# Altium PCB MB1364.PcbDoc (part 3 of 9)
Units mm, origin at the board's own origin, x right, y up, seen from the top; angles counter-clockwise.
Board outline 70 x 133.34 mm, 6 copper layers (Top Layer, Signal Layer 1, Signal Layer 2, Signal Layer 3, Signal Layer 4, Bottom Layer), stack 1.57 mm thick; 321 components, 287 nets, 1372 pads, 2051 vias.
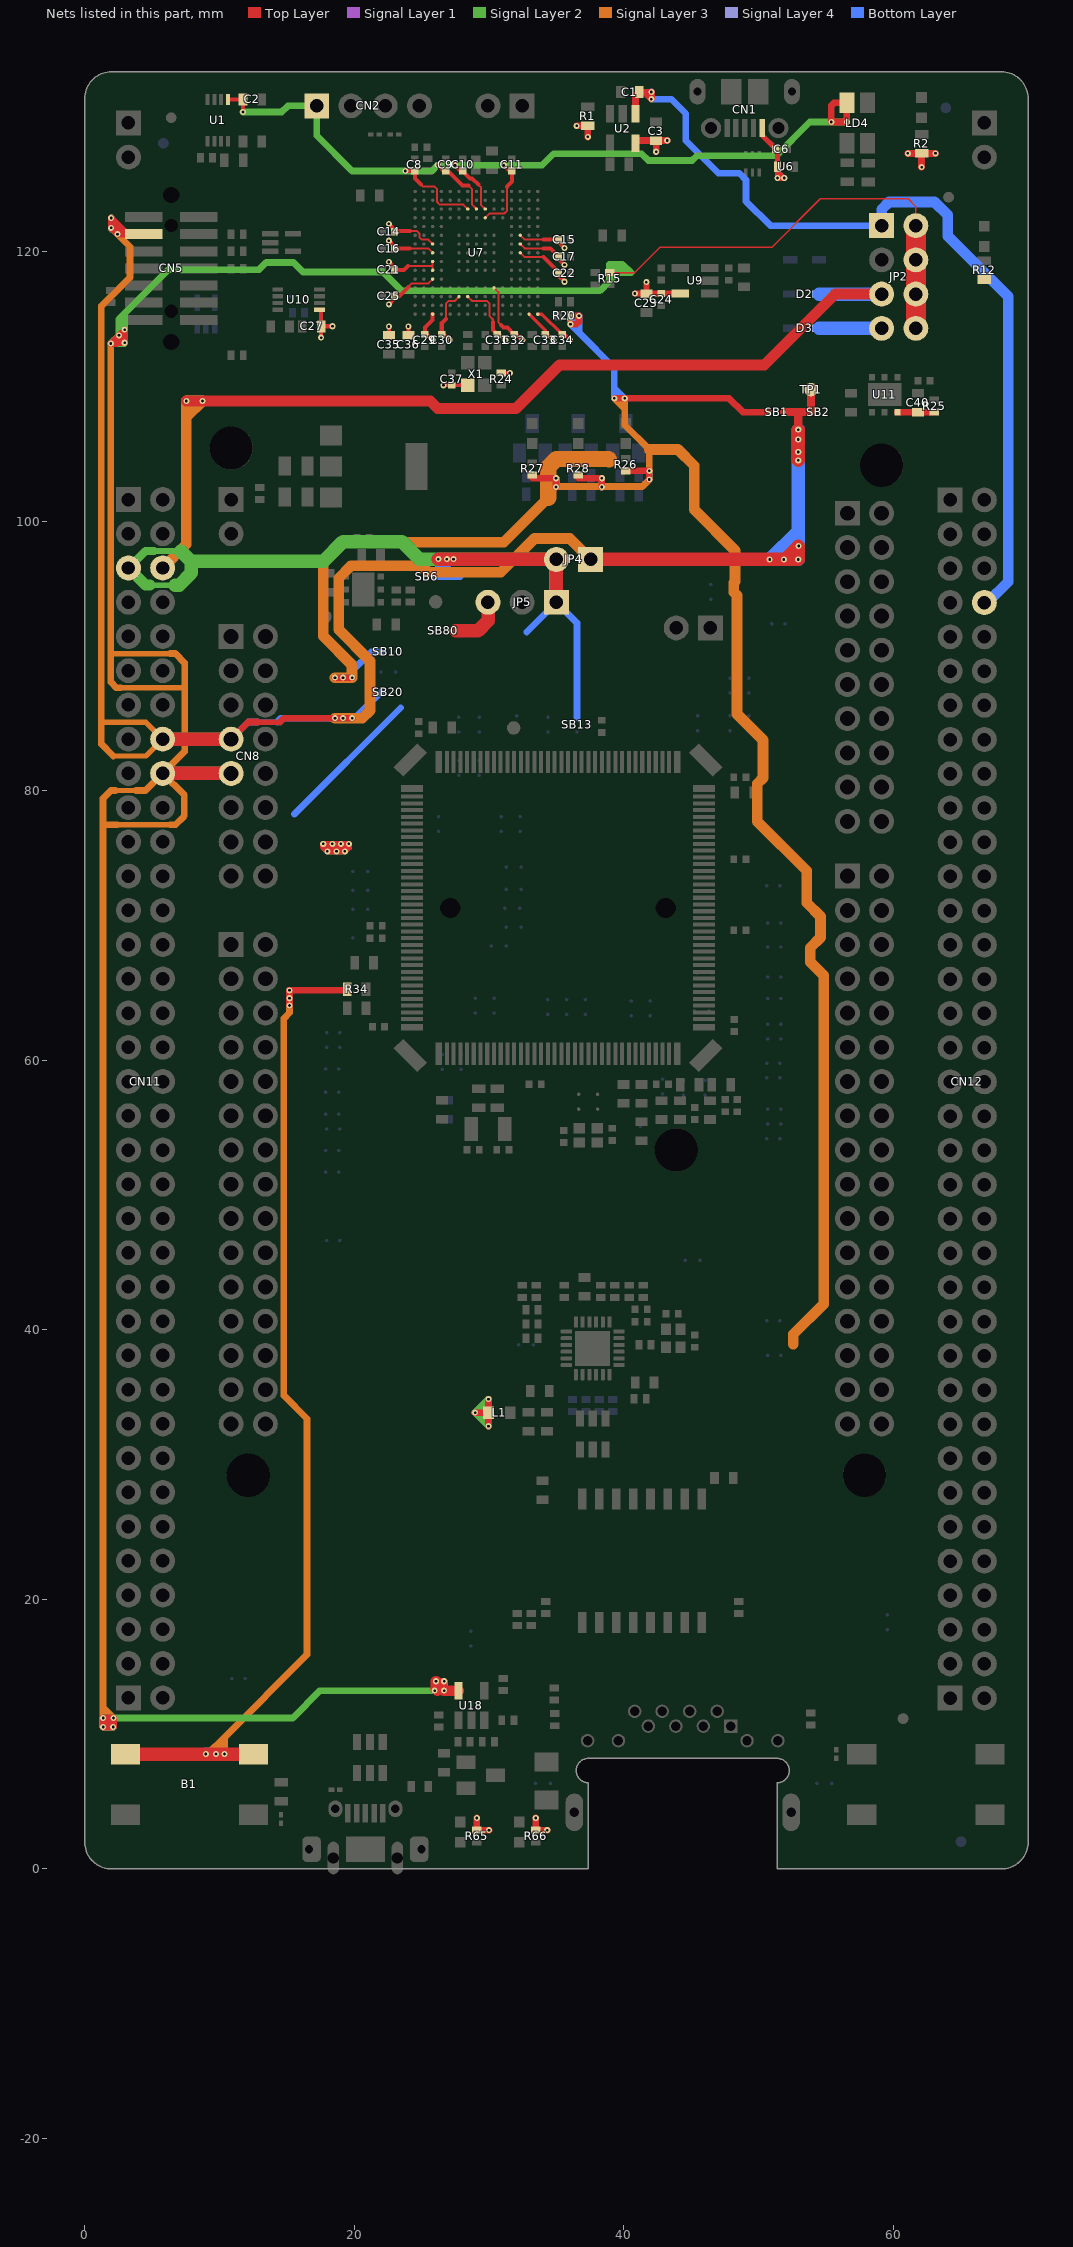
[diagram p6: the nets of this part, all layers, seen from the top]

## Part data (continued)
U19: library part MCD-00163, "Very low capacitance ESD protection", Manufacturer=STMICROELECTRONICS, ComponentLink1Description=Datasheet, ComponentLink1URL=http://tunmcdsvn.tun.st.com/Component_Datasheet_Library/Trunk/Diodes/STM_ESD_USBLC6-2, Initial_Board_Reference=MB1263, Internal_Part_Number=MCD-00163, Manufacturer_Part_Number=USBLC6-2SC6, Part_Type=IC, Provided_By=Subcon, Status=Released
X1: library part MCD-00597, "Oscillator 25.00Mhz, -+50PPM, 3.3V, Temp -55 to +125°C", Alternate_Manufacturer="AVX CORP/KYOCERA CORP", Alternate_Manufacturer_Part_Number=KC2520B25.0000C10E00, Manufacturer=NDK, Manufacturer_Part_Number="NZ2520SB 25MHz END4869B", ComponentLink1Description=Datasheet, ComponentLink1URL=http://tunmcdsvn.tun.st.com/Component_Datasheet_Library/Trunk/Crystal_Osc/NDK_OSCILLATOR_NZ2520SB, Initial_Board_Reference=MB1331, Internal_Part_Number=MCD-00597, Order_Code_Digikey=478-4780-1-ND, Part_Type=Crystal_Osc, Provided_By=STM, Status=Checked
X2: library part MCD-00091, "Crystal 32.768kHz, 6pF, -+20PPM, R=50K, SMD", Manufacturer=NDK, Manufacturer_Part_Number="NX3215SA 32.768KHz EXS00A-MU00525", ComponentLink1Description=Datasheet, ComponentLink1URL="http://tunmcdsvn.tun.st.com/Component_Datasheet_Library/Trunk/Crystal_Osc/NDK_Crystal-For-ST_NX3215SA 32.768KHz EXS00A-MU00525 (EXS10B-21238)", Initial_Board_Reference=MB1274, Internal_Part_Number=MCD-00091, Part_Type=Crystal_Osc, Provided_By=STM, Status=Released
X3 X4: library part MCD-01364, "25MHz Crystal. 2x1.6mm package size. 20ppm. Load capacitance: 6pF. Spec EXS00A-CS11321", Manufacturer=NDK, Manufacturer_Part_Number="NX2016SA 25MHz EXS00A-CS11321", Package=NX2016SA, ComponentLink1Description=Datasheet, ComponentLink1URL="http://tunmcdsvn.tun.st.com/Component_Datasheet_Library/Trunk/Crystal_Osc/NDK_NX2016SA 25MHz EXS00A-CS11321 (EXS10B-28187)", Initial_Board_Reference=MB1363, Internal_Part_Number=MCD-01364, Part_Type=Crystal_Osc, Provided_By=Subcon, Status=Checked

## Free pads (board coordinates)
  round 3.2 hole 3.2 unplated: 0(10.866,105.409) 0(12.136,29.209) 0(43.886,53.339) 0(57.856,29.209) 0(59.126,104.139)

## Via types
v1: diameter 0.45, hole 0.2, Top Layer to Bottom Layer, tented both sides, 1975 vias
v2: diameter 0.45, hole 0.2, Top Layer to Bottom Layer, tented top, 67 vias
v3: diameter 0.6, hole 0.3, Top Layer to Bottom Layer, tented both sides, 9 vias

## Nets (pads, with @x,y where several pads share a name; then routed paths per layer and width w, separated by ;. In a path a pad name is that pad's centre, name@x,y a point inside that pad or via, vN(x,y) a via of type N, cw(c..) or ccw(c..) an arc to the next point about the centre after c; other vN are vias at no path point)
1V8_VDD: JP5.3 SB80.2 | length 4.3
  Top Layer w0.6: 27.3,91.85 27.525,91.85
  Top Layer w1: 27.525,91.85 29.175,91.85 29.925,92.6 JP5.3@29.925,93.975
3V3: CN5.3 CN8.7 CN11.16 JP4.1 SB1.1 SB2.2 SB20.1 TP1.1 | length 184.6
  Top Layer w0.4: 12.845,85.089 14.501,85.089
  Top Layer w0.5: CN5.3@4.389,121.284 CN5.3@3.161,121.284 ; CN8.7@10.866,83.819 12.136,85.089 12.845,85.089 ; 14.501,85.089 14.791,85.379 v1(18.566,85.379) v1(19.166,85.379) v1(19.841,85.379) ; v1(2.436,121.284) 2.436,122.009 ; v1(2.436,121.284) v1(1.966,121.754) v1(1.966,122.479) 2.436,122.009 ; v1(2.436,121.284) CN5.3@3.161,121.284 ; 2.436,122.009 CN5.3@3.161,121.284
  Top Layer w0.6: SB1.1@51.891,108.079 52.941,108.079 ; v1(52.941,106.779) 52.941,108.079 ; TP1.1@53.891,109.754 SB2.2@53.891,108.079 52.941,108.079
  Top Layer w1: CN11.16@5.786,83.819 CN8.7@10.866,83.819 ; JP4.1@37.536,97.154 v1(50.816,97.154) v1(51.866,97.154) v1@51.966,97.154 ; v1(52.941,104.504) v1(52.941,105.129) v1(52.941,106.054) v1(52.941,106.779) ; v1@51.966,97.154 52.941,98.129 v1(52.941,97.154) v1@51.966,97.154
  Signal Layer 2 w0.5: v1(1.966,122.479) v1(1.966,121.754) v1(2.436,121.284) ; v1(18.566,85.379) v1(19.166,85.379) v1(19.841,85.379)
  Signal Layer 2 w0.6: v1(50.816,97.154) v1(51.866,97.154) v1@51.966,97.154 ; v1(52.941,104.504) v1(52.941,105.129) v1(52.941,106.054) v1(52.941,106.779) ; v1@51.966,97.154 v1(52.966,98.154) 52.966,97.179 v1(52.941,97.154) v1@51.966,97.154
  Signal Layer 2 w1: CN11.16@5.786,83.819 CN8.7@10.866,83.819
  Signal Layer 3 w0.4: 1.316,85.079 4.526,85.079 CN11.16@5.786,83.819 4.541,82.574 2.121,82.574
  Signal Layer 3 w0.5: 1.316,85.079 1.236,85.159 ; 2.121,82.574 1.236,83.459 1.236,85.159 ; v1(19.166,85.379) v1(19.841,85.379) ; 1.236,85.159 1.236,115.949 3.366,118.079 3.366,120.354 v1(2.436,121.284) ; v1(2.436,121.284) 2.436,122.009 v1(1.966,122.479) v1(1.966,121.754) v1(2.436,121.284)
  Signal Layer 3 w0.6: v1@50.941,97.154 v1(51.866,97.154) v1@51.966,97.154 ; v1(52.941,104.504) v1(52.941,105.129) v1(52.941,106.054) v1(52.941,106.779) ; v1@51.966,97.154 v1(52.966,98.154) 52.966,97.179 v1(52.941,97.154) v1@51.966,97.154
  Signal Layer 3 w0.8: v1(18.566,85.379) v1(19.166,85.379) v1(19.841,85.379) 20.591,85.379 21.166,85.954 21.166,89.629 18.841,91.954 18.841,95.757 19.762,96.679 25.041,96.679 25.516,96.204 30.866,96.204 33.366,98.704 35.986,98.704 JP4.1@37.536,97.154
  Bottom Layer w0.4: 12.845,85.089 14.281,85.089
  Bottom Layer w0.5: v1(1.966,122.479) v1(1.966,121.754) v1(2.436,121.284) ; CN8.7@10.866,83.819 12.136,85.089 12.845,85.089 ; 14.281,85.089 14.571,85.379 17.216,85.379 ; 17.231,85.364 17.216,85.379 ; SB20.1@21.975,87.3 20.054,85.379 v1(19.841,85.379) v1(19.166,85.379) v1(18.566,85.379) 17.234,85.379 17.216,85.379
  Bottom Layer w1: v1(50.816,97.154) v1@50.841,97.154 ; v1(52.941,106.779) v1(52.941,106.054) v1(52.941,105.129) v1(52.941,104.504) 52.941,99.254 ; v1@50.841,97.154 52.941,99.254 ; v1@50.841,97.154 v1(51.866,97.154) ; v1(51.866,97.154) v1@52.941,98.229 ; v1(51.866,97.154) v1(52.941,97.154) v1@52.941,98.229 ; v1@52.941,98.229 52.941,99.254
3V3_PER: L1.2 R20.2 R26.2 R27.2 R28.2 R65.2 R66.2 SB1.2 SB10.1 | length 183.7
  Top Layer w0.5: v1(18.566,88.379) v1(19.166,88.379) v1(19.841,88.379) ; v1(28.966,33.854) L1.2@29.966,33.854 ; v1(29.091,3.779) R65.2@29.091,2.879 v1(29.991,2.879) ; v1(29.966,32.854) L1.2@29.966,33.854 ; v1(29.966,34.854) L1.2@29.966,33.854 ; R27.2@33.216,103.179 v1(34.966,103.179) v1(34.966,102.529) ; v1(33.466,3.779) R66.2@33.466,2.879 v1(34.316,2.879) ; R28.2@36.616,103.179 v1(38.366,103.179) v1(38.366,102.529) ; v1(39.291,109.104) v1(40.066,109.104) 47.816,109.104 48.841,108.079 SB1.2@50.791,108.079 ; R26.2@40.141,103.729 v1(41.891,103.729) v1(41.891,103.079) ; v1(36.041,114.604) R20.2@36.041,115.229 v1(36.666,115.229) 36.666,114.779 36.491,114.604 v1(36.041,114.604)
  Signal Layer 2 w0.5: v1(18.566,88.379) v1(19.166,88.379) v1(19.841,88.379) ; v1(29.966,32.854) v1(28.966,33.854) v1(29.966,34.854)
  Signal Layer 3 w0.5: v1(34.966,103.179) v1(34.966,102.529) 35.011,102.574 38.321,102.574 v1(38.366,102.529) ; v1(38.366,103.179) v1(38.366,102.529) ; v1(38.366,102.529) 38.399,102.562 41.374,102.562 v1(41.891,103.079) v1(41.891,103.729) 41.891,105.304 40.066,107.129 40.066,108.329 ; 40.066,108.329 v1(39.291,109.104) v1(40.066,109.104) 40.066,108.329
  Signal Layer 3 w0.8: v1(18.566,88.379) v1(19.166,88.379) v1(19.841,88.379) 19.841,89.329 17.691,91.479 17.691,96.854 19.266,98.429 31.091,98.429 34.391,101.729 ; 41.891,105.304 44.016,105.304 45.216,104.104 45.216,100.854 48.25,97.82 48.25,95.524 48.155,95.429 48.155,94.716 48.395,94.476 48.395,85.68 50.32,83.755 50.32,80.934 49.905,80.519 49.905,77.72 ; 49.905,78.75 49.905,77.72 ; 52.575,38.95 52.575,39.675 54.825,41.925 54.825,66.291 53.833,67.283 53.833,68.337 54.595,69.099 54.595,70.658 53.575,71.678 53.575,74.05 49.905,77.72
  Signal Layer 3 w1.2: 34.391,101.729 34.391,104.004 34.991,104.604 38.866,104.604 38.891,104.579
  Bottom Layer w0.5: v1(18.566,88.379) v1(19.166,88.379) v1(19.841,88.379) 19.841,88.866 21.275,90.3 SB10.1@21.975,90.3 ; v1(29.966,32.854) v1(28.966,33.854) v1(29.966,34.854) ; v1(34.966,102.529) v1(34.966,103.179) ; v1(38.366,102.529) v1(38.366,103.179) ; v1(41.891,103.079) v1(41.891,103.729) ; v1(36.041,114.604) v1(36.666,115.229) 36.666,114.579 ; v1(36.041,114.604) 36.666,113.979 ; v1(36.041,114.604) 36.641,114.604 36.666,114.579 ; 36.666,113.979 36.666,114.579 ; 36.666,113.979 39.291,111.354 39.291,109.879 ; 39.291,109.879 v1(40.066,109.104) v1(39.291,109.104) 39.291,109.879
3V3_STLK: C2.2 C8.2 C9.2 C10.2 C11.2 C14.2 C15.2 C16.2 C17.2 C21.2 C22.2 C23.2 C24.2 C25.2 C27.2 C29.2 C30.2 C31.2 C32.2 C33.2 C34.2 C35.2 C36.2 C37.2 CN2.1 LD4.4 R24.1 U1.1 U7.C1 U7.C5 U7.C6 U7.C7 U7.C8 U7.C9 U7.F3 U7.G3 U7.G13 U7.H13 U7.J12 U7.J13 U7.K4 U7.N8 U7.N9 U7.N10 U7.P1 U7.R1 U9.5 U10.1 X1.4 | length 141.5
  Top Layer w0.15: 23.996,118.924 25.224,118.924 ; 24.016,117.379 24.271,117.634 25.496,117.634 U7.C5@25.816,117.954 ; 24.116,120.229 25.491,120.229 U7.C8@25.816,119.904 ; 24.141,121.529 24.644,121.529 24.836,121.336 24.836,121.059 25.016,120.879 25.491,120.879 U7.C9@25.816,120.554 ; 24.966,124.954 25.091,124.829 25.941,124.829 26.146,124.624 26.146,123.671 26.339,123.479 28.091,123.479 U7.G13@28.416,123.154 ; 25.225,118.925 25.224,118.924 ; 25.8,118.95 25.774,118.924 25.224,118.924 ; U7.C6@25.816,118.604 U7.C7@25.816,119.254 ; 26.791,114.979 26.791,116.131 26.984,116.324 27.436,116.324 U7.F3@27.766,116.654 ; U7.G3@28.416,116.654 28.736,116.334 29.839,116.334 30.036,116.136 30.036,115.209 30.291,114.954 30.291,114.779 ; 28.466,124.904 28.746,124.624 28.746,123.474 U7.H13@29.066,123.154 ; 29.216,124.954 29.396,124.774 29.396,123.474 U7.J13@29.716,123.154 ; U7.J12@29.716,122.504 30.041,122.829 31.144,122.829 31.336,123.021 31.336,124.799 31.341,124.804 ; U7.K4@30.366,117.304 30.686,116.984 30.686,114.759 30.891,114.554 ; U7.N8@32.316,119.904 32.641,119.579 34.041,119.579 ; U7.N9@32.316,120.554 32.641,120.229 34.041,120.229 ; U7.N10@32.316,121.204 32.641,120.879 34.041,120.879
  Top Layer w0.25: U7.P1@32.966,115.354 34.166,114.154 C33.2@34.166,113.854 ; U7.R1@33.616,115.354 33.916,115.354 C34.2@35.416,113.854
  Top Layer w0.3: U1.1@10.616,131.279 C2.2@11.741,131.279 v1(11.741,130.354) ; U10.1@17.416,115.679 17.541,115.554 C27.2@17.541,114.454 ; v1(17.541,113.604) C27.2@17.541,114.454 ; v1(18.391,114.454) C27.2@17.541,114.454 ; v1(22.562,116.083) 22.991,116.512 C25.2@22.991,116.679 23.316,116.679 24.016,117.379 ; v1(22.562,119.225) 22.991,118.796 C21.2@22.991,118.629 23.701,118.629 23.996,118.924 ; v1(22.562,120.8) 22.991,120.371 C16.2@22.991,120.204 23.016,120.229 24.116,120.229 ; v1(22.562,122.05) 22.991,121.621 C14.2@22.991,121.454 23.066,121.529 24.141,121.529 ; C35.2@22.566,113.779 v1(22.566,114.429) ; v1(23.791,125.979) C8.2@24.491,125.979 24.491,125.429 24.966,124.954 ; C36.2@24.016,113.779 v1(24.016,114.429) ; U7.C1@25.816,115.354 25.816,114.929 25.241,114.354 C29.2@25.241,113.854 25.408,113.854 v1(25.837,113.425) ; v1(26.195,126.408) 26.624,125.979 C9.2@26.791,125.979 26.966,125.979 28.041,124.904 28.466,124.904 ; v1(26.616,110.079) C37.2@27.241,110.079 X1.4@28.416,110.079 ; 26.791,114.979 26.491,114.679 C30.2@26.491,113.854 26.658,113.854 v1(27.087,113.425) ; v1(27.47,126.408) 27.899,125.979 C10.2@28.041,125.979 ; C10.2@28.066,125.979 C10.2@28.041,125.979 ; 29.216,124.954 28.741,125.429 28.579,125.429 28.041,125.967 C10.2@28.041,125.979 ; 30.291,114.779 30.291,114.179 C31.2@30.616,113.854 30.783,113.854 v1(31.212,113.425) ; 30.891,114.554 31.086,114.359 31.361,114.359 C32.2@31.866,113.854 32.033,113.854 v1(32.462,113.425) ; R24.1@30.916,110.979 v1(31.541,110.979) ; v1(31.095,126.408) 31.524,125.979 C11.2@31.691,125.979 31.716,125.954 31.716,125.179 31.341,124.804 ; 34.041,119.579 35.141,118.479 C22.2@35.141,118.379 C22.2@35.166,118.354 ; 34.041,120.229 34.541,120.229 C17.2@35.141,119.629 C17.2@35.166,119.604 ; 34.041,120.879 C15.2@35.141,120.879 C15.2@35.166,120.854 ; C33.2@34.166,113.854 34.333,113.854 v1(34.762,113.425) ; C22.2@35.141,118.354 C22.2@35.166,118.354 ; C17.2@35.141,119.604 C17.2@35.166,119.604 ; C15.2@35.141,120.854 C15.2@35.166,120.854 ; C34.2@35.416,113.854 35.583,113.854 v1(36.012,113.425) ; v1(35.595,117.758) 35.166,118.187 C22.2@35.166,118.354 ; v1(35.595,119.008) 35.166,119.437 C17.2@35.166,119.604 ; v1(35.595,120.258) 35.166,120.687 C15.2@35.166,120.854
  Top Layer w0.45: v1(40.816,116.879) C23.2@41.666,116.879 ; v1(41.666,117.729) C23.2@41.666,116.879 ; U9.5@44.191,116.879 C24.2@42.791,116.879 C23.2@41.666,116.879
  Top Layer w0.5: v1(55.391,129.604) v1(56.541,129.604) 56.541,131.004 LD4.4@56.566,131.029 55.591,131.029 55.391,130.829 v1(55.391,129.604)
  Signal Layer 2 w0.5: v1(11.741,130.354) 14.616,130.354 15.071,130.809 CN2.1@17.216,130.809 17.216,128.604 19.846,125.974 25.761,125.974 v1(26.195,126.408) v1(27.47,126.408) v1(31.095,126.408) 33.945,126.408 34.791,127.254 41.316,127.254 41.816,126.754 45.066,126.754 45.411,127.099 51.286,127.099 53.791,129.604 v1(55.391,129.604) v1(56.541,129.604)
3V3_VDD: B1.1 B1.2 CN11.5 JP4.2 JP5.1 R34.2 SB6.1 SB13.1 | length 186.1
  Top Layer w0.45: v1@17.725,76.05 17.725,76.025 17.95,75.8 19.35,75.8 v1(19.6,76.05) ; v1@17.725,76.05 v1(17.7,76.05) 17.7,75.8 v1(18,75.5) v1(18.675,75.5) v1(19.3,75.5) 19.6,75.8 v1(19.6,76.05) ; v1@17.725,76.05 v1(18.375,76.05) v1(19,76.05) v1(19.6,76.05)
  Top Layer w0.5: v1(15.2,64.063) v1(15.2,64.6) v1(15.2,65.183) 19.475,65.183 R34.2@19.475,65.25
  Top Layer w1: B1.1@3.017,8.523 v1(8.991,8.523) v1(9.741,8.523) v1(10.366,8.523) B1.2@12.517,8.523 ; v1(26.241,97.179) v1(26.866,97.179) v1(27.366,97.179) 34.971,97.179 JP4.2@34.996,97.154 JP5.1@34.996,93.979
  Signal Layer 2 w0.4: 4.846,95.249 6.701,95.249
  Signal Layer 2 w0.45: 5.154,97.789 7.126,97.789 ; v1(17.7,76.05) v1@17.712,76.05 ; v1@17.712,76.05 17.712,75.787 v1(18,75.5) v1(18.675,75.5) v1(19.3,75.5) 19.6,75.8 v1@19.6,75.975 ; v1@17.712,76.05 17.988,75.775 19.4,75.775 v1@19.6,75.975 ; v1@17.712,76.05 v1(18.375,76.05) v1(19,76.05) v1(19.6,76.05) v1@19.6,75.975
  Signal Layer 2 w0.5: v1(8.991,8.523) v1(9.741,8.523) v1(10.366,8.523) ; v1(15.2,64.063) v1(15.2,64.6) v1(15.2,65.183)
  Signal Layer 2 w0.6: CN11.5@3.246,96.519 4.516,97.789 5.154,97.789 ; 7.126,97.789 7.136,97.779
  Signal Layer 2 w0.8: CN11.5@3.246,96.519 4.516,95.249 4.846,95.249
  Signal Layer 2 w1: 6.701,95.249 7.011,95.249 7.911,96.149 7.911,97.004 ; 7.136,97.779 7.911,97.004 ; JP5.1@34.996,93.979 JP4.2@34.996,97.154 24.866,97.154 23.541,98.479 19.166,98.479 17.691,97.004 7.911,97.004
  Signal Layer 3 w0.5: v1(8.991,8.523) v1@9.123,8.523 ; v1(15.2,65.183) v1(15.2,64.6) v1(15.2,64.063) 15.2,63.525 14.775,63.1 14.775,35.125 16.5,33.4 16.5,15.9 10.366,9.766 ; v1(26.241,97.179) v1(26.866,97.179) v1(27.366,97.179) ; v1@9.123,8.523 10.366,9.766 ; v1@9.123,8.523 v1(9.741,8.523) ; v1(9.741,8.523) 10.366,9.148 ; v1(9.741,8.523) v1(10.366,8.523) 10.366,9.148 ; 10.366,9.148 10.366,9.766
  Bottom Layer w0.5: v1(15.2,64.063) v1(15.2,64.6) v1(15.2,65.183) ; 15.56,78.26 23.45,86.15 ; 27.866,95.879 SB6.1@25.941,95.879 25.941,95.929 26.241,96.229 26.241,96.754 ; 32.796,91.779 JP5.1@34.996,93.979 36.525,92.45 SB13.1@36.525,85.45 ; 26.241,96.754 v1(26.241,97.179) v1(26.866,97.179) v1(27.366,97.179) 27.041,96.854 26.341,96.854 26.241,96.754
  Bottom Layer w1: v1(8.991,8.523) v1(9.741,8.523) v1(10.366,8.523) ; JP5.1@34.996,93.979 JP4.2@34.996,97.154
5V: C40.2 CN8.9 CN11.18 JP2.2 JP2.4 JP2.6 JP2.8 R12.2 R15.1 R25.2 U11.6 U18.5 | length 322
  Top Layer w0.12: R15.1@38.941,118.429 40.791,118.429 42.666,120.304 50.966,120.304 54.566,123.904 61.096,123.904 61.666,123.334 JP2.2@61.666,121.919
  Top Layer w0.45: v1(2.541,113.779) 2.956,114.194 v1(2.966,114.204)
  Top Layer w0.5: v1(1.941,113.179) v1(2.541,113.779) ; v1(2.141,11.204) 2.141,10.554 v1(2.116,10.529) v1(1.366,10.529) ; v1@2.956,114.194 2.966,114.194 2.966,113.804 ; U18.5@27.736,13.229 U18.5@27.741,13.224 ; U11.6@60.298,108.076 61.813,108.076 C40.2@61.816,108.079 R25.2@63.016,108.079 ; v1(1.366,10.529) v1(1.366,11.204) 2.041,11.204 v1(1.366,10.529) ; 2.391,113.229 2.966,113.804 ; 2.391,113.229 2.004,113.229 1.954,113.179 2.341,113.179 2.391,113.229 ; 2.391,113.229 v1(2.966,113.229) 2.966,113.804 ; v1(25.966,13.229) 25.966,13.829 v1(26.066,13.929) v1(26.666,13.929) ; v1(25.966,13.229) 26.166,13.229 v1(26.666,13.229) v1(26.666,13.929) ; v1(25.966,13.229) 26.066,13.329 v1(26.666,13.929)
  Top Layer w0.8: v1(26.066,13.929) 26.066,13.329 v1@26.166,13.229 ; v1(26.666,13.229) U18.5@27.736,13.229
  Top Layer w1: CN11.18@5.786,81.279 5.802,81.295 10.85,81.295 CN8.9@10.866,81.279
  Top Layer w1.5: JP2.8@61.666,114.299 JP2.6@61.666,116.839 JP2.4@61.666,119.379 JP2.2@61.666,121.919
  Signal Layer 2 w0.5: v1(1.941,113.179) v1@1.966,113.179 ; v1(26.666,13.229) v1(25.966,13.229) ; 40.541,118.429 40.516,118.429 ; v1@1.466,10.529 2.116,11.179 v1(2.116,10.529) v1@1.466,10.529 ; v1@1.466,10.529 v1(1.366,10.529) v1(1.366,11.204) v1(2.141,11.204) 15.441,11.204 17.466,13.229 v1(25.966,13.229) ; v1@1.966,113.179 1.966,113.204 v1(2.541,113.779) ; v1@1.966,113.179 2.916,113.179 v1(2.966,113.229) v1@2.966,113.354 ; v1(2.541,113.779) 2.541,114.979 2.966,115.404 ; v1(2.541,113.779) v1(2.966,114.204) ; v1(2.541,113.779) v1@2.966,113.354 ; v1@2.966,113.354 v1(2.966,114.204) ; v1(2.966,114.204) 2.966,115.404 ; 2.966,115.404 6.216,118.654 12.941,118.654 13.466,119.179 15.491,119.179 16.191,118.479 22.141,118.479 23.541,117.079 38.216,117.079 38.941,117.804 ; v1(25.966,13.229) 25.966,13.829 v1(26.066,13.929) ; v1(26.066,13.929) 26.666,13.329 v1(26.666,13.929) v1(26.066,13.929) ; 38.941,117.804 39.566,118.429 ; 38.941,117.804 38.941,118.429 ; 38.941,118.429 39.566,118.429 ; 38.941,118.429 38.941,119.054 ; 38.941,119.054 39.566,118.429 ; 38.941,119.054 39.466,119.054 ; 39.466,119.054 39.891,119.054 40.516,118.429 ; 39.466,119.054 40.091,118.429 ; 39.566,118.429 40.091,118.429 ; 40.091,118.429 40.516,118.429
  Signal Layer 2 w1: CN11.18@5.786,81.279 5.802,81.295 10.85,81.295 CN8.9@10.866,81.279
  Signal Layer 2 w1.5: JP2.8@61.666,114.299 JP2.6@61.666,116.839 JP2.4@61.666,119.379 JP2.2@61.666,121.919
  Signal Layer 3 w0.4: 1.941,90.179 1.951,90.169 6.347,90.169 ; 2.286,80.009 3.807,80.009 ; 2.401,77.469 6.347,77.469 ; 2.685,87.629 7.416,87.629 7.441,87.654
  Signal Layer 3 w0.5: 2.286,80.009 1.946,80.009 1.366,79.429 1.366,77.454 ; 2.401,77.469 1.381,77.469 1.366,77.454 ; 2.685,87.629 2.366,87.629 1.941,88.054 1.941,90.179 v1(1.941,113.179) v1@1.991,113.229 ; v1@2.941,113.254 2.541,113.654 v1(2.541,113.779) ; 3.807,80.009 4.516,80.009 CN11.18@5.786,81.279 ; 6.347,77.469 6.731,77.469 7.391,78.129 7.391,79.674 CN11.18@5.786,81.279 ; 6.347,90.169 6.726,90.169 7.416,89.479 7.416,87.629 7.416,82.909 CN11.18@5.786,81.279 ; v1(1.366,11.204) 1.366,11.979 ; v1(1.366,11.204) v1(2.141,11.204) 1.366,11.979 ; v1(1.366,11.204) v1(1.366,10.529) v1@1.466,10.529 ; 1.366,11.979 1.366,77.454 ; v1@1.466,10.529 2.116,11.179 v1(2.116,10.529) v1@1.466,10.529 ; v1@1.991,113.229 v1(2.966,113.229) v1(2.966,114.204) v1(2.541,113.779) ; v1@1.991,113.229 v1(2.541,113.779) ; v1(26.066,13.929) v1@26.666,13.329 ; v1(26.066,13.929) 25.966,13.829 v1(25.966,13.229) v1(26.666,13.229) v1@26.666,13.329 ; v1(26.066,13.929) v1(26.666,13.929) v1@26.666,13.329
  Signal Layer 3 w1.5: JP2.8@61.666,114.299 JP2.2@61.666,121.919
  Bottom Layer w0.5: v1(2.141,11.204) v1(1.366,11.204) v1(1.366,10.529) v1@1.491,10.529 ; v1(26.066,13.929) 25.966,13.829 v1(25.966,13.229) v1(26.666,13.229) v1@26.666,13.354 ; v1@1.491,10.529 2.116,11.154 v1(2.116,10.529) v1@1.491,10.529 ; v1(2.541,113.779) v1(2.966,114.204) v1(2.966,113.229) ; v1(2.541,113.779) v1(1.941,113.179) 2.916,113.179 v1(2.966,113.229) ; v1(2.541,113.779) 2.541,113.654 v1(2.966,113.229) ; v1@26.666,13.354 26.091,13.929 v1(26.666,13.929) v1@26.666,13.354
  Bottom Layer w1.5: JP2.8@61.666,114.299 JP2.2@61.666,121.919
5V_EXT: CN11.6 D2.1 JP2.5 | length 76
  Top Layer w0.8: v1(7.541,108.904) v1(8.741,108.904) 25.641,108.904 26.191,108.354 31.991,108.354 35.221,111.584 50.421,111.584 55.676,116.839 JP2.5@59.126,116.839
  Signal Layer 3 w0.8: CN11.6@5.786,96.519 7.541,98.274 7.541,107.704 ; 7.541,107.704 v1(8.741,108.904) v1(7.541,108.904) 7.541,107.704
  Bottom Layer w1: D2.1@54.481,116.839 56.137,116.839 JP2.5@59.126,116.839
5V_USB_CHGR: C3.2 C6.2 CN1.1 D3.1 JP2.7 R1.2 R2.2 U2.5 U6.1 | length 20.7
  Top Layer w0.4: U2.5@40.866,128.014 U2.5@40.866,128.229 ; C3.2@42.394,128.229 C3.2@42.396,128.227 ; CN1.1@50.266,129.158 50.266,128.626 51.249,127.643 C6.2@51.249,127.593 51.399,127.443 U6.1@51.399,126.293 U6.1@51.399,125.946 ; U6.1@51.399,125.946 v1(51.899,125.446) v1(51.399,125.446) U6.1@51.399,125.946
  Top Layer w0.5: v1(36.498,129.324) 36.503,129.329 R1.2@37.325,129.329 37.325,128.507 v1(37.33,128.502) ; U2.5@40.866,128.229 C3.2@42.394,128.229 ; v1(42.401,127.401) 42.396,127.406 C3.2@42.396,128.227 43.218,128.227 v1(43.223,128.232) ; v1(61.066,127.279) R2.2@62.091,127.279 ; v1(62.091,126.254) R2.2@62.091,127.279 ; v1(63.116,127.279) R2.2@62.091,127.279
  Signal Layer 1 w0.4: v1@51.416,125.429 51.433,125.446 v1(51.899,125.446)
  Signal Layer 2 w0.4: v1(51.399,125.446) v1(51.899,125.446)
  Signal Layer 3 w0.4: v1(51.399,125.446) v1(51.899,125.446)
  Signal Layer 4 w0.4: v1(51.399,125.446) v1(51.899,125.446)
  Bottom Layer w0.4: v1(51.399,125.446) v1(51.899,125.446)
  Bottom Layer w1: D3.1@54.481,114.299 JP2.7@59.126,114.299
5V_USB_STLK: C1.2 CN12.8 JP2.1 U2.1 | length 65.7
  Top Layer w0.508: U2.1@40.866,130.214 40.866,131.537 C1.2@41.148,131.82 41.525,131.82 ; 41.525,131.82 v1@42.041,131.82 ; 41.525,131.82 v1(42.041,131.304) v1@42.041,131.82 ; v1@42.041,131.82 42.05,131.82 v1(42.041,131.829) v1@42.041,131.82
  Bottom Layer w0.5: v1(42.041,131.304) 43.516,131.304 44.591,130.229 44.591,128.229 47.016,125.804 48.566,125.804 49.071,125.299 49.071,123.724 50.876,121.919 JP2.1@59.126,121.919
  Bottom Layer w0.508: v1(42.041,131.304) v1(42.041,131.829)
  Bottom Layer w0.8: JP2.1@59.126,121.919 59.126,123.126 59.679,123.679 63.046,123.679 64.025,122.7 64.025,121.145 68.516,116.654 68.516,95.504 66.966,93.954 CN12.8@66.746,93.954